# Altium PCB LTE GNSS Tracker.PcbDoc (part 3 of 5)
Units mil, origin at the board's own origin, x right, y up, seen from the top; angles counter-clockwise.
Board outline 2165.35 x 4361.93 mil, 4 copper layers (Top Layer, Layer 1, Layer 2, Bottom Layer), stack 38.189 mil thick; 158 components, 113 nets, 617 pads, 1197 vias.
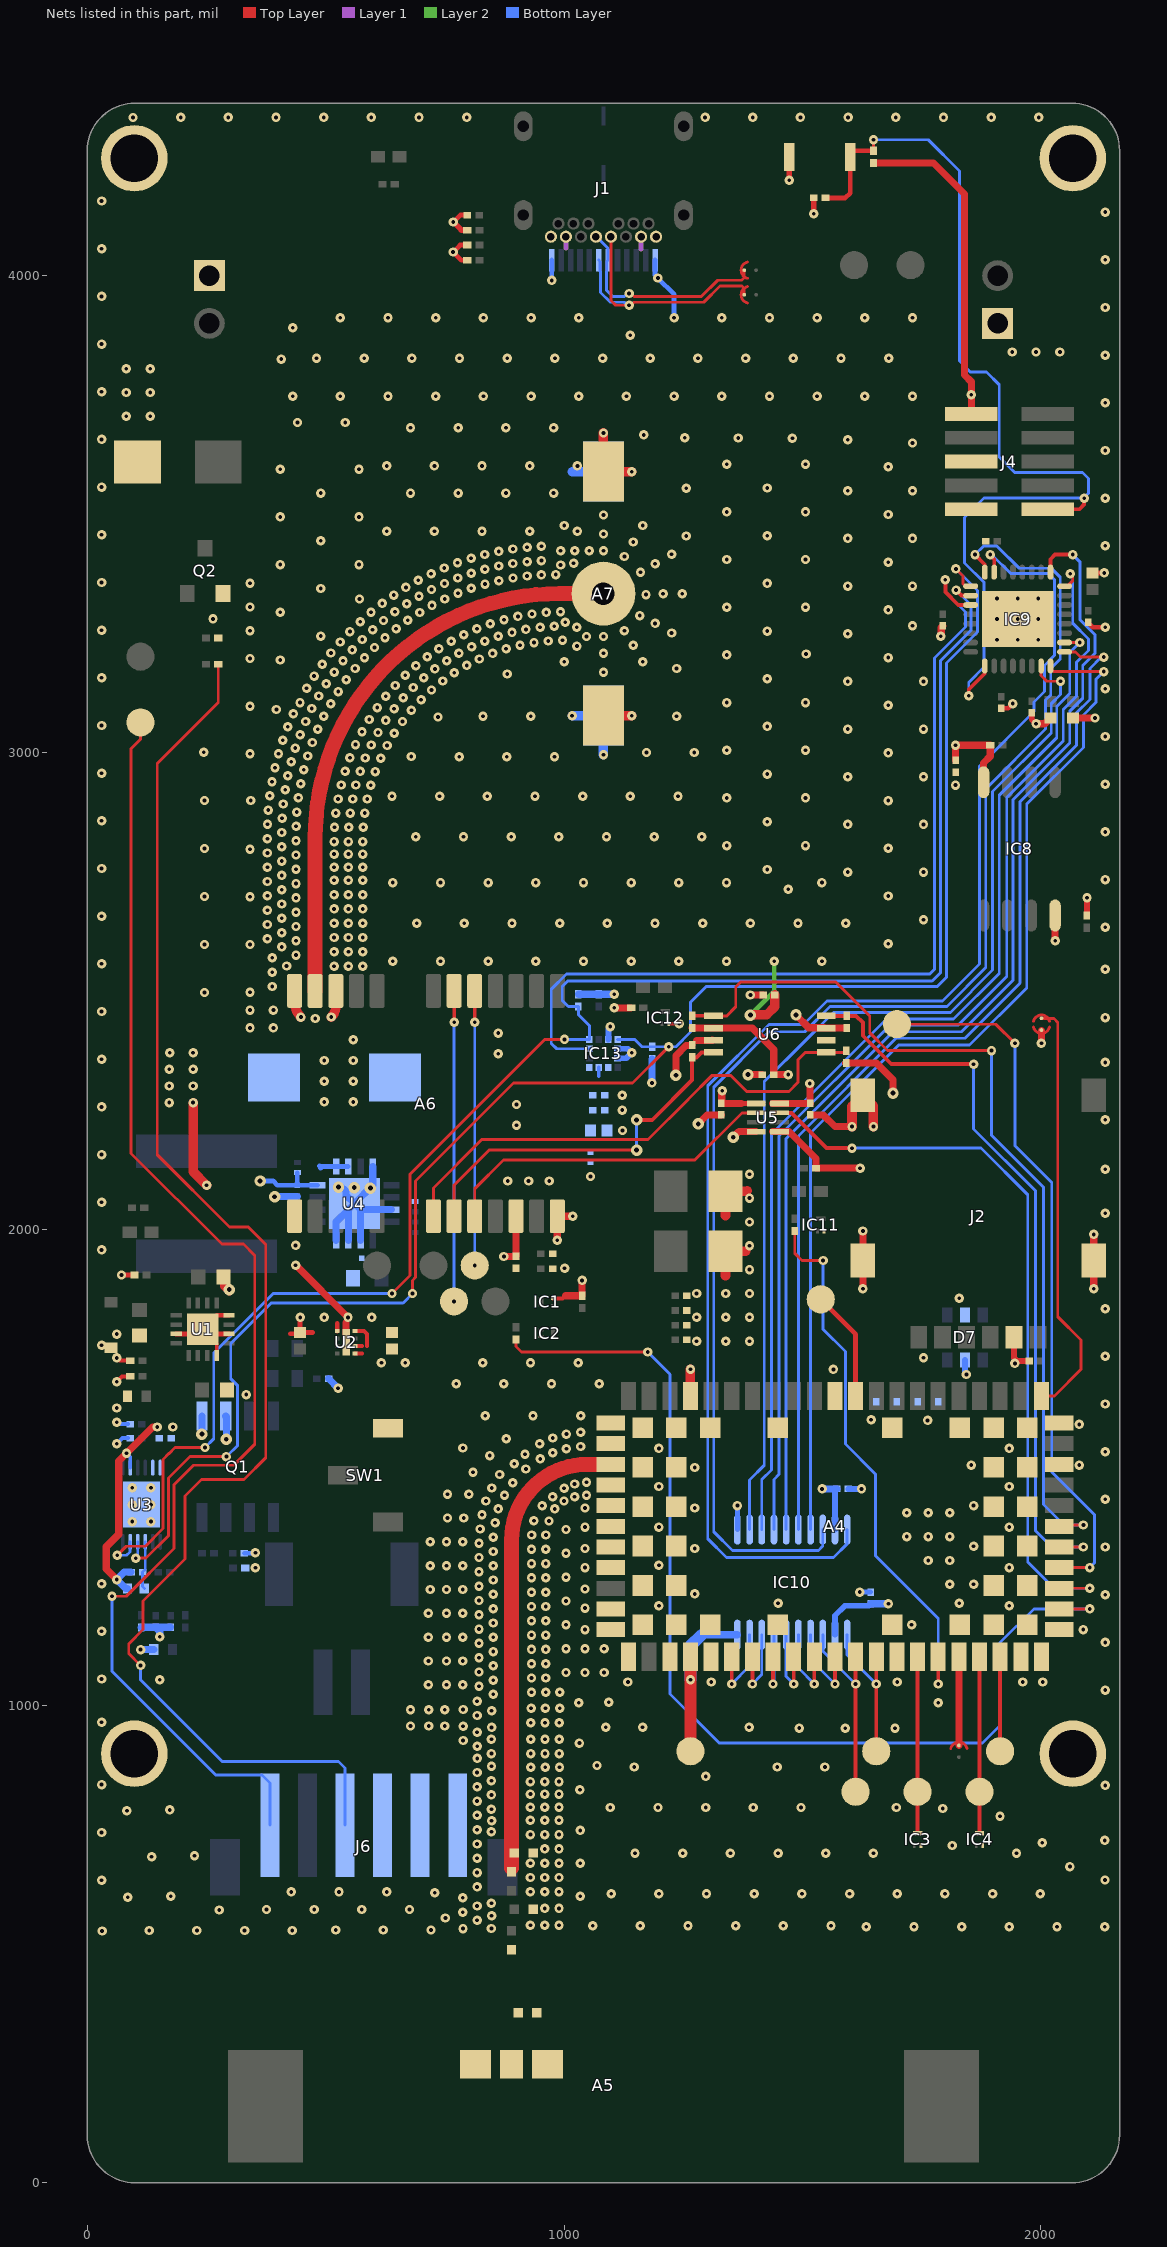
[diagram p4: the nets of this part, all layers, seen from the top]

## Part data (continued)
R8: library part Resistor, "RES SMD 330 OHM 1% 1/20W 0201", Device Package="0201 (0603 Metric)", Manufacturer=Yageo, Operating Temperature="-55°C ~ 125°C", Part Number=RC0201FR-07330RL, Power (Watts)="0.05W, 1/20W", Ratings=AEC-Q200, Supplier Device Package=0201, Supplier Part Number 1=YAG2604TR-ND, Temperature Coefficient=±200ppm/°C, Tolerance=±1%, ComponentLink1Description=Datasheet, ComponentLink1URL=https://industrial.panasonic.com/cdbs/www-data/pdf/RDA0000/AOA0000C304.pdf, ComponentLink2Description="DigiKey Link", ComponentLink2URL=http://digikey.com/product-detail/en/panasonic-electronic-components/ERJ-1GNF1002C/P122414CT-ND/7389440, Composition="Thick Film", Features="Automotive AEC-Q200", Height - Seated (Max)="0.010\" (0.26mm)", LastUpdated="21/01/2020 00:04:13", Lifecycle Status=Active, Minimum Order=1, Number of Terminations=2, Package / Case="0201 (0603 Metric)", Packaging=TapeAndReel, Part Status=Active, PartId=2296, Price=0.01, Resistance="330 Ohms", Series=ERJ, Size / Dimension="0.024\" L x 0.012\" W (0.60mm x 0.30mm)", Supplier 1=Digi-Key
R9 R14 R18: library part RSMT0626, "RES 100K OHM 1% 1/20W 0201", Manufacturer="Stackpole Electronics Inc", Part Number=RMCF0201FT100K, Supplier Part Number 1=RMCF0201FT100KTR-ND, ComponentLink1Description=Datasheet, ComponentLink1URL=https://chn-vm-apps.microchip.com/mchprepo/parts/Datasheets/AOA0000CE2.pdf, Supplier 1=Digi-Key
R10 R35: library part RSMT0626, "RES 1M OHM 1% 1/20W 0201", Manufacturer="Stackpole Electronics Inc", Part Number=RMCF0201FT1M00, Supplier Part Number 1=RMCF0201FT1M00TR-ND, ComponentLink1Description=Datasheet, ComponentLink1URL=https://chn-vm-apps.microchip.com/mchprepo/parts/Datasheets/AOA0000CE2.pdf, Supplier 1=Digi-Key
R11: library part ERJ-1GNJ205C, "Res Thick Film 0201 2M Ohm 5% 1/20W -400ppm/°C to 150ppm/°C Molded SMD SMD T/R", Case Code (Imperial)=0201, Case Code (Metric)=0603, Manufacturer=Panasonic, Max Operating Temperature=125°C, Max Power Dissipation=50mW, Min Operating Temperature=-55°C, Package Quantity=15000, Resistance=2MR, Resistor Type="Thick Film", Supplier Part Number 1=P123274CT-ND, Temperature Coefficient=150ppm/°C, Tolerance=5%, Voltage Rating=25V, Case/Package=0201, Category="Chip SMD Resistors", ComponentLink1Description=http://www.onlinecomponents.com/datasheet/erj-1gnj205c.aspx?p=44467765&src-supplier=Onlinecomponents.com, ComponentLink1URL=http://www.onlinecomponents.com/datasheet/erj-1gnj205c.aspx?p=44467765&src-supplier=Onlinecomponents.com, ComponentLink2Description=http://www.mouser.com/ds/2/315/AOA0000CE1-37422.pdf?src-supplier=Mouser, ComponentLink2URL=http://www.mouser.com/ds/2/315/AOA0000CE1-37422.pdf?src-supplier=Mouser, ComponentLink3Description=https://b2b-api.panasonic.eu/file_stream/pids/fileversion/1242?src-supplier=Digi-Key, ComponentLink3URL=https://b2b-api.panasonic.eu/file_stream/pids/fileversion/1242?src-supplier=Digi-Key, ComponentLink4Description=http://industrial.panasonic.com/www-cgi/jvcr13pz.cgi?E+PZ+3+AOA0002+ERJ1GNJ205C+7+WW?src-supplier=Digi-Key, ComponentLink4URL=http://industrial.panasonic.com/www-cgi/jvcr13pz.cgi?E+PZ+3+AOA0002+ERJ1GNJ205C+7+WW?src-supplier=Digi-Key, ComponentLink5Description=https://industrial.panasonic.com/cdbs/www-data/pdf/RDM0000/DMM0000COL11.pdf?src-supplier=Digi-Key, ComponentLink5URL=https://industrial.panasonic.com/cdbs/www-data/pdf/RDM0000/DMM0000COL11.pdf?src-supplier=Digi-Key, Height=0.01inch, Length=0.024inch, Manufacturer Part Number=ERJ-1GNJ205C, Mount="Surface Mount", Number of Terminations=2, Packaging="Tape and Reel", Power Rating=50mW, Pricing 1="1=0.10000, 10=0.03400, 100=0.01400, 1000=0.00629, 2500=0.00546, 5000=0.00451 (USD)", RoHS=Yes, RoHS Compliant=Yes, Stock 1=118626, Supplier 1=Digi-Key, Termination=SMD/SMT, Width=0.012inch
R12: library part ERJ-1GNJ394C, "Res Thick Film 0201 390K Ohm 5% 1/20W ±200ppm/°C Molded SMD SMD T/R", Case Code (Imperial)=0201, Case Code (Metric)=0603, Manufacturer=Panasonic, Max Operating Temperature=125°C, Max Power Dissipation=50mW, Min Operating Temperature=-55°C, Package Quantity=15000, Resistance=390kR, Resistor Type="Thick Film", Supplier Part Number 1=P123319CT-ND, Temperature Coefficient=200ppm/°C, Tolerance=5%, Voltage Rating=25V, Case/Package=0201, Category="Chip SMD Resistors", ComponentLink1Description=http://www.onlinecomponents.com/datasheet/erj-1gnj394c.aspx?p=44467790&src-supplier=Onlinecomponents.com, ComponentLink1URL=http://www.onlinecomponents.com/datasheet/erj-1gnj394c.aspx?p=44467790&src-supplier=Onlinecomponents.com, ComponentLink2Description=http://www.mouser.com/ds/2/315/AOA0000CE1-37422.pdf?src-supplier=Mouser, ComponentLink2URL=http://www.mouser.com/ds/2/315/AOA0000CE1-37422.pdf?src-supplier=Mouser, ComponentLink3Description=http://industrial.panasonic.com/www-cgi/jvcr13pz.cgi?E+PZ+3+AOA0002+ERJ1GNJ394C+7+WW?src-supplier=Digi-Key, ComponentLink3URL=http://industrial.panasonic.com/www-cgi/jvcr13pz.cgi?E+PZ+3+AOA0002+ERJ1GNJ394C+7+WW?src-supplier=Digi-Key, ComponentLink4Description=https://b2b-api.panasonic.eu/file_stream/pids/fileversion/1242?src-supplier=Digi-Key, ComponentLink4URL=https://b2b-api.panasonic.eu/file_stream/pids/fileversion/1242?src-supplier=Digi-Key, Height=0.01inch, Length=0.024inch, Manufacturer Part Number=ERJ-1GNJ394C, Mount="Surface Mount", Number of Terminations=2, Packaging="Tape and Reel", Power Rating=50mW, Pricing 1="1=0.10000, 10=0.03400, 100=0.01400, 1000=0.00629, 2500=0.00546, 5000=0.00451 (USD)", RoHS=Yes, Stock 1=14453, Supplier 1=Digi-Key, Width=0.3mm
R13 R22 R23 R24 R27 R28 R29: library part Resistor, "RES SMD 3.3K OHM 1% 1/20W 0201", Device Package="0201 (0603 Metric)", Manufacturer="Panasonic Electronic Components", Operating Temperature="-55°C ~ 125°C", Part Number=ERJ-1GNF3301C, Power (Watts)="0.05W, 1/20W", Ratings=AEC-Q200, Supplier Device Package=0201, Supplier Part Number 1=P122937CT-ND, Temperature Coefficient=±200ppm/°C, Tolerance=±1%, ComponentLink1Description=Datasheet, ComponentLink1URL=https://industrial.panasonic.com/cdbs/www-data/pdf/RDA0000/AOA0000C304.pdf, ComponentLink2Description="DigiKey Link", ComponentLink2URL=http://digikey.com/product-detail/en/panasonic-electronic-components/ERJ-1GNF3301C/P122937CT-ND/8342813, Composition="Thick Film", Features="Automotive AEC-Q200", Height - Seated (Max)="0.010\" (0.26mm)", LastUpdated="21/01/2020 00:04:10", Lifecycle Status=Active, Minimum Order=1, Number of Terminations=2, Package / Case="0201 (0603 Metric)", Packaging=TapeAndReel, Part Status=Active, PartId=4142, Price=0.01, Resistance="3.3 kOhms", Series=ERJ, Size / Dimension="0.024\" L x 0.012\" W (0.60mm x 0.30mm)", Supplier 1=DigiKey
R15: library part Thermistor, "THERMISTOR NTC 10KOHM 3380K 0402", B Value Tolerance=±1%, Device Package="0402 (1005 Metric)", Manufacturer="TDK Corporation", Operating Temperature="-40°C ~ 125°C", Power - Max=100mW, Resistance in Ohms @ 25°C=10k, Supplier Part Number 1=445-2550-1-ND, B25/50=3380K, B25/85=3435K, ComponentLink1Description=Datasheet, ComponentLink1URL=https://product.tdk.com/info/en/catalog/datasheets/503021/tpd_commercial_ntc-thermistor_ntcg_en.pdf?ref_disty=digikey, ComponentLink2Description="DigiKey Link", ComponentLink2URL=http://digikey.com/product-detail/en/tdk-corporation/NTCG103JF103FT1/445-2550-1-ND/934249, LastUpdated="21/01/2020 03:30:28", Lifecycle Status=Active, Minimum Order=1, Mounting Type="Surface Mount", Package / Case="0402 (1005 Metric)", Packaging=TapeAndReel, Part Number=NTCG103JF103FT1, Part Status=Active, PartId=199, Price=0.03, Resistance Tolerance=±1%, Series=NTCG, Supplier 1=DigiKey
R16: library part Resistor, "RES 0.01 OHM 1% 1/5W 0402", Device Package="0402 (1005 Metric)", Manufacturer="Panasonic Electronic Components", Operating Temperature="-55°C ~ 125°C", Part Number=ERJ-2LWFR010X, Power (Watts)="0.2W, 1/5W", Supplier Device Package=0402, Supplier Part Number 1=P19181CT-ND, Temperature Coefficient="0/ +500ppm/°C", Tolerance=±1%, ComponentLink1Description=Datasheet, ComponentLink1URL=https://industrial.panasonic.com/cdbs/www-data/pdf/RDN0000/AOA0000C313.pdf, ComponentLink2Description="DigiKey Link", ComponentLink2URL=http://digikey.com/product-detail/en/panasonic-electronic-components/ERJ-2LWFR010X/P19181CT-ND/6004536, Composition="Thick Film", Features="Current Sense", Height - Seated (Max)="0.018\" (0.45mm)", LastUpdated="21/01/2020 02:16:15", Lifecycle Status=Active, Minimum Order=1, Number of Terminations=2, Package / Case="0402 (1005 Metric)", Packaging=TapeAndReel, Part Status=Active, PartId=348, Price=0.05, Resistance="10 mOhms", Series=ERJ, Size / Dimension="0.039\" L x 0.020\" W (1.00mm x 0.50mm)", Supplier 1=DigiKey
R17: library part RSMT0626, "RES SMD 0 OHM JUMPER 1/16W 0402", Manufacturer=Yageo, Part Number=RC0402JR-070RP, Supplier Part Number 1=YAG1279TR-ND, ComponentLink1Description=Datasheet, ComponentLink1URL=https://chn-vm-apps.microchip.com/mchprepo/parts/Datasheets/AOA0000CE2.pdf, Supplier 1=Digi-Key
R19 R20 R21 R30: library part Resistor, "RES SMD 3.3K OHM 1% 1/20W 0201", Device Package="0201 (0603 Metric)", Manufacturer="Panasonic Electronic Components", Operating Temperature="-55°C ~ 125°C", Part Number=ERJ-1GNF3301C, Power (Watts)="0.05W, 1/20W", Ratings=AEC-Q200, Resistance="3.3 kOhms", Supplier Device Package=0201, Supplier Part Number 1=P122937CT-ND, Temperature Coefficient=±200ppm/°C, Tolerance=±1%, ComponentLink1Description=Datasheet, ComponentLink1URL=https://industrial.panasonic.com/cdbs/www-data/pdf/RDA0000/AOA0000C304.pdf, ComponentLink2Description="DigiKey Link", ComponentLink2URL=http://digikey.com/product-detail/en/panasonic-electronic-components/ERJ-1GNF3301C/P122937CT-ND/8342813, Composition="Thick Film", Features="Automotive AEC-Q200", Height - Seated (Max)="0.010\" (0.26mm)", LastUpdated="21/01/2020 00:04:10", Lifecycle Status=Active, Minimum Order=1, Number of Terminations=2, Package / Case="0201 (0603 Metric)", Packaging=TapeAndReel, Part Status=Active, PartId=4142, Price=0.01, Series=ERJ, Size / Dimension="0.024\" L x 0.012\" W (0.60mm x 0.30mm)", Supplier 1=DigiKey
R25 R26: library part Resistor, "RES SMD 1K OHM 1% 1/20W 0201", Device Package="0201 (0603 Metric)", Manufacturer="Panasonic Electronic Components", Operating Temperature="-55°C ~ 125°C", Part Number=ERJ-1GNF1001C, Power (Watts)="0.05W, 1/20W", Ratings=AEC-Q200, Supplier Device Package=0201, Supplier Part Number 1=P122413CT-ND, Temperature Coefficient=±200ppm/°C, Tolerance=±1%, ComponentLink1Description=Datasheet, ComponentLink1URL=https://industrial.panasonic.com/cdbs/www-data/pdf/RDA0000/AOA0000C304.pdf, ComponentLink2Description="DigiKey Link", ComponentLink2URL=http://digikey.com/product-detail/en/panasonic-electronic-components/ERJ-1GNF1001C/P122413CT-ND/7389439, Composition="Thick Film", Features="Automotive AEC-Q200", Height - Seated (Max)="0.010\" (0.26mm)", LastUpdated="21/01/2020 00:04:13", Lifecycle Status=Active, Minimum Order=1, Number of Terminations=2, Package / Case="0201 (0603 Metric)", Packaging=TapeAndReel, Part Status=Active, PartId=2298, Price=0.01, Resistance="1 kOhms", Series=ERJ, Size / Dimension="0.024\" L x 0.012\" W (0.60mm x 0.30mm)", Supplier 1=DigiKey
R31 R34: library part RSMT0626, "RES SMD 10K OHM 1% 1/20W 0201", Manufacturer=Yageo, Part Number=RC0201FR-0710KL, Supplier Part Number 1=311-10.0KMTR-ND, ComponentLink1Description=Datasheet, ComponentLink1URL=https://chn-vm-apps.microchip.com/mchprepo/parts/Datasheets/AOA0000CE2.pdf, Supplier 1=Digi-Key
R32 R33: library part Resistor, "RES 100 OHM 1% 1/20W 0201", Device Package="0201 (0603 Metric)", Manufacturer="KOA Speer Electronics, Inc.", Operating Temperature="-55°C ~ 155°C", Part Number=RK73H1HTTC1000F, Power (Watts)="0.05W, 1/20W", Ratings=AEC-Q200, Supplier Device Package=0201, Supplier Part Number 1=2019-RK73H1HTTC1000FCT-ND, Temperature Coefficient=±200ppm/°C, Tolerance=±1%, ComponentLink1Description=Datasheet, ComponentLink1URL=http://www.koaspeer.com/catimages/Products/RK73H/RK73H.pdf, ComponentLink2Description="DigiKey Link", ComponentLink2URL=http://digikey.com/product-detail/en/koa-speer-electronics-inc/RK73H1HTTC1000F/2019-RK73H1HTTC1000FCT-ND/9845801, Composition="Thick Film", Features="Automotive AEC-Q200, Moisture Resistant", Height - Seated (Max)="0.010\" (0.26mm)", LastUpdated="21/01/2020 00:04:16", Lifecycle Status=Active, Minimum Order=1, Number of Terminations=2, Package / Case="0201 (0603 Metric)", Packaging=TapeAndReel, Part Status=Active, PartId=1552, Price=0.01, Resistance="100 Ohms", Series=RK73H, Size / Dimension="0.024\" L x 0.012\" W (0.60mm x 0.30mm)", Supplier 1=DigiKey
Rth: library part RSMT0626, "THERMISTOR NTC 10KOHM 3380K 0402", Manufacturer="TDK Corporation", Part Number=NTCG103JF103HT1, Supplier Part Number 1=445-174898-2-ND, ComponentLink1Description=Datasheet, ComponentLink1URL=https://chn-vm-apps.microchip.com/mchprepo/parts/Datasheets/AOA0000CE2.pdf, Supplier 1=Digi-Key
S1: library part "SPST-NO 2 PIN", "SWITCH TACTILE SPST-NO 0.02A 15V", Contact Rating @ Voltage="0.02A @ 15VDC", Manufacturer=C&K, Operating Force=100gf, Operating Temperature="-40°C ~ 85°C", Supplier Part Number 1=CKN10777CT-ND, Actuator Height off PCB, Vertical=0.60mm, Actuator Orientation="Top Actuated", Actuator Type=Standard, Circuit=SPST-NO, ComponentLink1Description=Datasheet, ComponentLink1URL=https://dznh3ojzb2azq.cloudfront.net/products/Tactile/KXT3/documents/datasheet.pdf, ComponentLink2Description="DigiKey Link", ComponentLink2URL=http://digikey.com/product-detail/en/c-k/KXT-311-LHS/CKN10777CT-ND/6599755, Illumination=Non-Illuminated, LastUpdated="25/01/2020 19:35:40", Lifecycle Status=Active, Minimum Order=1, Mounting Type="Surface Mount", Outline="3.00mm x 2.00mm", Packaging=TapeAndReel, Part Number="KXT 311 LHS", Part Status=Active, Price=0.11, Series=KXT3, Supplier 1=DigiKey, Switch Function=Off-Mom, Termination Style="SMD (SMT) Tab"
SW1: library part SW_slide, "SWITCH SLIDE SPDT 300MA 6V", Manufacturer=C&K, Part Number=JS102011JCQN, Supplier Part Number 1=CKN10721TR-ND, Supplier 1=Digi-Key
U1: "Battery Charger Li-Ion 1500mA 4.1V 16-Pin VQFN EP T/R", Case/Package="VQFN EP", Manufacturer="Texas Instruments", Max Operating Temperature=85°C, Max Power Dissipation=2.3W, Max Supply Voltage=6.4V, Min Input Voltage=4.3V, Min Operating Temperature=-40°C, Min Supply Voltage=4.35V, Operating Supply Current=1.5mA, Output Current=1.5A, Output Voltage=4.1V, Package Quantity=250, Supplier Part Number 1=296-BQ24079TRGTTCT-ND, Category="Battery Management", ComponentLink1Description=https://datasheet.ciiva.com/15115/getdatasheetpartid-517600-15115033.pdf?src-supplier=Verical, ComponentLink1URL=https://datasheet.ciiva.com/15115/getdatasheetpartid-517600-15115033.pdf?src-supplier=Verical, ComponentLink2Description=https://datasheet.ciiva.com/1934/bq24075t-1934673.pdf?src-supplier=Digi-Key, ComponentLink2URL=https://datasheet.ciiva.com/1934/bq24075t-1934673.pdf?src-supplier=Digi-Key, Contact Plating=Gold, Lead Free="Lead Free", Manufacturer Part Number=BQ24079TRGTT, Number of Cells=1, Number of Pins=16, Packaging="Tape and Reel", Pricing 1="1=3.03000, 10=2.72500, 25=2.57040, 100=2.19010 (USD)", Radiation Hardening=No, RoHS=Yes, RoHS Compliant=Yes, Series=-, Stock 1=10, Supplier 1=Digi-Key
U2: "IC REG LINEAR 3.3V 1A 8XDFN", Manufacturer="ON Semiconductor", Supplier Part Number 1=NCP186BMX330TAGOSTR-ND, Part Number=NCP186BMX330TAG, RefDes=RefDes, Supplier 1=Digi-Key, Type=DEV, Vendor="ON Semiconductor"
U3: library part "TI BQ27542DRZR-G1", "IC BATT FUEL GAUGE LI-ION 12SON", Device Package="12-VFDFN Exposed Pad", Manufacturer="Texas Instruments", Operating Temperature="-40°C ~ 85°C (TA)", Supplier Device Package="12-SON (2.5x4)", Supplier Part Number 1=296-44346-1-ND, Battery Chemistry=Lithium-Ion, ComponentLink1Description=Datasheet, ComponentLink1URL=http://www.ti.com/general/docs/suppproductinfo.tsp?distId=10&gotoUrl=http%3A%2F%2Fwww.ti.com%2Flit%2Fgpn%2Fbq27542-g1, ComponentLink2Description="DigiKey Link", ComponentLink2URL=http://digikey.com/product-detail/en/texas-instruments/BQ27542DRZR-G1/296-44346-1-ND/6110619, Function="Battery Monitor", Interface="HDQ, I²C", LastUpdated="30/03/2020 16:23:27", Lifecycle Status=Active, Minimum Order=1, Mounting Type="Surface Mount", Number of Cells=1, Package / Case="12-VFDFN Exposed Pad", Packaging=TapeAndReel, Part Number=BQ27542DRZR-G1, Part Status=Active, Price=1.28, Series="Impedance Track™", Supplier 1=DigiKey
U4: "5-V Output, 1-A, 96% Efficient Boost Converter w/20uA Iq in TSSOP-16 16-QFN -40 to 85", Case/Package=VQFN, Manufacturer="Texas Instruments", Max Input Voltage=5.5V, Max Operating Temperature=85°C, Max Output Current=1A, Min Input Voltage=1.8V, Min Operating Temperature=-40°C, Min Output Voltage=5V, Package Quantity=1, Quiescent Current=20uA, Supplier Part Number 1=296-16662-6-ND, Switching Frequency=600kHz, Category="Voltage Regulators - Switching", ComponentLink1Description=https://datasheet.ciiva.com/15113/getdatasheetpartid-188315-15113727.pdf?src-supplier=Verical, ComponentLink1URL=https://datasheet.ciiva.com/15113/getdatasheetpartid-188315-15113727.pdf?src-supplier=Verical, ComponentLink2Description=https://datasheet.ciiva.com/26896/tps61032rsar-26896598.pdf?src-supplier=IIIC, ComponentLink2URL=https://datasheet.ciiva.com/26896/tps61032rsar-26896598.pdf?src-supplier=IIIC, ComponentLink3Description=https://datasheet.ciiva.com/22684/1902788-22684647.pdf?src-supplier=Element14, ComponentLink3URL=https://datasheet.ciiva.com/22684/1902788-22684647.pdf?src-supplier=Element14, ComponentLink4Description=https://datasheet.ciiva.com/2026/tps61030-2026190.pdf?src-supplier=Digi-Key, ComponentLink4URL=https://datasheet.ciiva.com/2026/tps61030-2026190.pdf?src-supplier=Digi-Key, ComponentLink5Description=https://datasheet.ciiva.com/2026/tps61030-2026189.pdf?src-supplier=Digi-Key, ComponentLink5URL=https://datasheet.ciiva.com/2026/tps61030-2026189.pdf?src-supplier=Digi-Key, ComponentLink6Description=https://datasheet.ciiva.com/2026/tps61030-2026191.pdf?src-supplier=Digi-Key, ComponentLink6URL=https://datasheet.ciiva.com/2026/tps61030-2026191.pdf?src-supplier=Digi-Key, Efficiency=96%, Lead Free="Lead Free", Manufacturer Part Number=TPS61032RSAR, Mount="Surface Mount", Nominal Output Voltage=5V, Number of Outputs=1, Number of Pins=16, Operating Supply Voltage=5.5V, Output Configuration=Positive, Output Current=1A, Output Type=Fixed, Output Voltage=5V, Packaging="Tape and Reel", Pricing 1="1=3.13000, 10=2.80800, 25=2.65440, 100=2.30060, 250=2.18260, 500=1.95844, 1000=1.94775 (USD)", Radiation Hardening=No, REACH SVHC="No SVHC", RoHS=Yes, RoHS Compliant=Yes, Series=-, Stock 1=5439, Supplier 1=Digi-Key, Synchronous Rectifier=Yes, Topology=Boost, Weight=0.001464oz, Width=4mm
U5: "IC TXRX BUS 2BIT DUAL 3ST 8XSON", Manufacturer=Nexperia, Supplier Part Number 1=1727-6903-2-ND, Category="Voltage Level Shifters", ComponentLink1Description=https://assets.nexperia.com/documents/data-sheet/74AVCH2T45.pdf?src-supplier=Digi-Key, ComponentLink1URL=https://assets.nexperia.com/documents/data-sheet/74AVCH2T45.pdf?src-supplier=Digi-Key, Manufacturer Part Number=74AVCH2T45GT,115, Pricing 1="5000=0.19239 (USD)", RoHS=Yes, RoHS Compliant=Yes, Stock 1=342616, Supplier 1=Digi-Key
U6: "Voltage Level Translator 2-CH Bidirectional Automotive 8-Pin TSSOP T/R", Case/Package=TSSOP, High Level Output Current=-20uA, Low Level Output Current=20uA, Manufacturer="NXP Semiconductors", Max Operating Temperature=125°C, Max Power Dissipation=250mW, Max Supply Voltage=3.6V, Min Operating Temperature=-40°C, Min Supply Voltage=1.2V, Nominal Supply Current=3.3uA, Package Quantity=3000, Supplier Part Number 1=568-12374-6-ND, Category="Logic Gates", Channel Type=Bidirectional, ComponentLink1Description=https://datasheet.ciiva.com/29887/ntb0102-q100-29887588.pdf?src-supplier=Avnet, ComponentLink1URL=https://datasheet.ciiva.com/29887/ntb0102-q100-29887588.pdf?src-supplier=Avnet, ComponentLink2Description=https://datasheet.ciiva.com/29615/ntb0102-q100-29615979.pdf?src-supplier=Digi-Key, ComponentLink2URL=https://datasheet.ciiva.com/29615/ntb0102-q100-29615979.pdf?src-supplier=Digi-Key, Data Rate=100Mbps, Logic Function=Translator, Manufacturer Part Number=NTB0102DP-Q100H, Mount="Surface Mount", Number of Bits=2, Number of Channels=2, Number of Circuits=1, Number of Pins=8, Output Type=Voltage, Packaging="Tape and Reel", Pricing 1="1=1.30000, 10=1.16200, 25=1.10240, 100=1.06880 (USD)", Propagation Delay=4.4ns, Radiation Hardening=No, RoHS=Yes, RoHS Compliant=Yes, Stock 1=8500, Supplier 1=Digi-Key, Turn-On Delay Time=5.9ns
SB1 SB2 SB3 SB4: Artikkelnr Noca=N.A., Artikkelnr Simpro=N.A., Footprint Doc=Solderbridge, LatestRevisionDate=2009-12-14, Part Number=Solderbridge, Pin Count=2, Published=2009-12-14, Publisher="Nordic Semiconductor"

## Via types
v1: diameter 19.68, hole 7.87, Top Layer to Bottom Layer, 1112 vias
v2: diameter 19.68, hole 7.87, Top Layer to Bottom Layer, tented both sides, 56 vias
v3: diameter 24, hole 10, Top Layer to Bottom Layer, 29 vias

## Nets (pads, with @x,y where several pads share a name; then routed paths per layer and width w, separated by ;. In a path a pad name is that pad's centre, name@x,y a point inside that pad or via, vN(x,y) a via of type N, cw(c..) or ccw(c..) an arc to the next point about the centre after c; other vN are vias at no path point)
1V8: A4.4 C25.2 C28.2 C52.2 IC10.2 IC10.10 R19.1 R20.1 TP17.1 U5.8 U6.3 U6.6 | length 1049.2
  Top Layer w15: R20.1@1268.54,2422.44 1268.81,2422.17 1310.44,2422.17 1310.72,2421.9 1394.92,2421.9 1439.74,2377.07 C28.2@1439.74,2324.3 v2(1470,2324.3) ; U5.8@1437.38,2263.8 1516.43,2263.8 C25.2@1516.59,2263.96 1515.56,2264.99 v2(1515.56,2305.55) ; v3(1486.48,2449.35) 1513.33,2422.51 1546.33,2422.51 1546.94,2421.9 R19.1@1591.88,2421.89
  Top Layer w25: TP17.1@1265.11,904.93 v1(1265.11,1055.19) A4.4@1265.11,1103.13
  Bottom Layer w12: IC10.2@1568.26,1149.38 1568.26,1189.45 1589,1210.19 1639.07,1210.19 C52.2@1643.34,1214.41
  Bottom Layer w15: 1288.75,1149.39 IC10.10@1363.54,1149.38 ; C52.2@1643.34,1214.41 v2@1679,1214.43
  Bottom Layer w25: v1(1265.11,1055.19) 1265.11,1125.74 1288.75,1149.39
  other v2: 1680.29,1214.41
3V3: A6.22 C13.2 C24.2 C26.2 C27.2 C37.2 C53.2 FB1.1 FB5.1 IC1.S IC8.8 IC10.19 J4.1 R18.2 R21.1 R22.2 R23.2 R24.2 R25.1 R26.1 R27.2 R28.2 R29.2 R30.1 U2.1 U2.2 U2.4 U5.1 U5.5 U6.7 | length 2150
  Top Layer w8: U2.1@561.68,1739.17 576.02,1739.17 ; U2.2@561.68,1754.92 576.77,1754.92 ; U2.4@561.68,1786.42 580.43,1786.42 586.85,1780 586.85,1755 ; IC1.S@977.12,1854.37 996.99,1854.37 1002.9,1860.28
  Top Layer w10: 1371.72,2263.8 U5.1@1417.69,2263.8
  Top Layer w12: R23.2@2096.8,2657.84 2096.85,2657.89 2096.85,2693.91 v1(2096.85,2695)
  Top Layer w15: v2(873.78,1942.76) C24.2@899.24,1942.76 A6.22@899.24,2027.29 ; 1002.9,1860.28 R18.2@1037.77,1860.28 v2(1037.77,1892.5) ; v1(1105.06,2464.3) R26.1@1140.77,2464.3 ; v3(1234.58,2322.88) 1234.58,2363.79 1255.82,2385.04 1267.93,2385.04 1268.54,2385.65 R21.1@1268.54,2386.2 ; 1277.48,2395.69 1310.11,2395.69 U6.7@1310.72,2396.3 ; v2(1331.71,2290.48) 1330.81,2289.58 1330.81,2264.64 1330.74,2264.57 1330.74,2264.34 1330.37,2263.96 C26.2@1330.13,2263.96 1330.3,2263.8 1371.72,2263.8 ; v2(1390.81,2491.2) C27.2@1417.81,2491.2 ; U5.5@1437.38,2204.74 1471.92,2204.74 1528.56,2148.1 R25.1@1528.56,2128.04 v2(1620.94,2128.04) ; R30.1@1590.82,2348.6 R30.1@1591.82,2348.6 1654.83,2348.6 1689.94,2313.48 v3(1689.94,2285.57) ; R24.2@1649.01,4236.45 1775.01,4236.45 1840.23,4171.22 1840.23,3791.58 1854.3,3777.52 v2(1854.3,3750) J4.1@1854.3,3710 ; C37.2@1821.16,2983.26 v1(1821.16,3014.9) R22.2@1893.4,3014.9 ; IC8.8@1880.1,2937.47 1880.1,2978.1 1893.96,2991.96 R22.2@1893.96,3014.9 ; FB1.1@2067.85,3072.11 v1(2113.66,3072.11)
  Bottom Layer w12: IC10.19@1568.26,1369.86 1568.26,1451.6 C53.2@1571.84,1455.18
  Bottom Layer w15: R28.2@1030.15,2492.8 R27.2@1072.9,2492.8 v2(1105.07,2492.8) ; v2(1184.24,2306.86) 1184.4,2307.02 1184.4,2357.05 R29.2@1184.55,2357.2 ; v2(1541.25,1455.18) C53.2@1571.84,1455.18
  other v1: 616.85,1720 666.85,1720 1055.51,2110.39
3V3_ACCEL: C56.2 C57.2 C58.2 FB5.2 IC13.9 IC13.10 | length 18
  Bottom Layer w8: 1072.83,2320.98 IC13.9@1072.83,2338.98
+5V0: C8.1 C9.2 D3.C J5.1 J6.6 J7.1 R35.1 U4.1 U4.15 U4.16 | length 401.3
  Top Layer w20: v1(221.85,2265.51) 221.85,2120.7 v1(250.28,2092.26)
  Bottom Layer w10: v3(362.41,2101.12) 389.88,2101.12 398.87,2092.12 C9.2@440.49,2092.12 ; R35.1@440.49,2118.56 C9.2@440.49,2092.12 ; 447.85,2092.19 482.55,2092.19 U4.1@482.62,2092.26 ; 447.85,2092.26 440.62,2092.26 C9.2@440.49,2092.12 ; 487.13,2132.57 489.35,2130.35 489.35,2127.59 493.38,2131.63 U4.16@521.99,2131.63 U4.15@547.58,2131.63
  other v1: 151.85,1055 171.85,2265.51 171.85,2300.38 221.85,2300.38 171.85,2335.25 221.85,2335.25 172.72,2370.12 221.85,2370.12 81.85,3705 131.85,3705 81.85,3755 131.85,3755 81.85,3805 131.85,3805 1940,3840 1990,3840 2040,3840
ACCEL_INT: IC9.3 IC13.12 | length 1970.6
  Top Layer w8: v1(1799.79,3362.07) 1799.79,3336.26 1826.79,3309.26 IC9.3@1852.97,3309.26
  Bottom Layer w6: IC13.12@1053.15,2378.35 984.65,2378.35 973.2,2389.8 973.2,2503.21 1005.3,2535.31 1767.15,2535.31 1777.06,2545.22 1777.06,3198.22 1841.85,3263 1841.85,3294.21 1799.79,3336.26 v1(1799.79,3362.07)
BCVCC: C20.1 C23.2 R15.1 U3.2 U3.5 | length 479.1
  Top Layer w15: v1(61.85,1265) 39.85,1287 39.85,1334 66,1360.15 66,1513.87 137.13,1585 v1(146.85,1585)
  Bottom Layer w8: v1(82.13,1530) 90.13,1522 U3.2@90.13,1499.81
  Bottom Layer w15: R15.1@84.39,1246.39 80.46,1246.39 v1(61.85,1265) 77.56,1280.71 C20.1@91.6,1280.71
BM_TS: C20.2 R15.2 U3.9 | length 101.8
  Bottom Layer w6: R15.2@119.83,1246.39 116.01,1250.21 C20.2@116.09,1280.74 121.62,1286.32 U3.9@121.63,1344.3
CONTROL: J6.1 TP1.1 | length 2840
  Top Layer w6: v1(51.85,1230) 81.86,1230 182,1330.14 182,1463.88 222.87,1504.74 307.06,1504.74 351.11,1548.8 351.11,1945.09 327.58,1968.63 282.31,1968.63 91.85,2159.09 91.85,3007.85 111.53,3027.53 TP1.1@111.53,3063.04
  Bottom Layer w6: v1(51.85,1230) 51.85,1072.91 269.48,855.27 366.46,855.27 383.15,838.58 J6.1@383.15,750
D_N: J1.A7 J1.B7 SB3.1 | length 456.9
  Top Layer w6: v2(1136.47,3962.5) 1140.17,3962.5 1146.51,3956.16 1287.92,3956.16 1322.23,3990.47 1372.39,3990.47 1377.19,3995.27 SB3.1@1377.19,4011.48
  Bottom Layer w6: J1.B7@1066.93,4081.81 1068.21,4081.81 1092.52,4057.5 J1.A7@1092.52,4032.6 1089.61,4029.69 1089.61,4009.4 1088.68,4008.46 1088.68,3969.64 1102.16,3956.16 1126.42,3956.16 1132.76,3962.5 v2(1136.47,3962.5)
D_P: J1.A6 J1.B6 SB2.1 | length 590.3
  Top Layer w6: J1.B6@1098.43,4081.81 1098.43,3986.82 1098.43,3966.48 1098.43,3947.68 1108.29,3937.82 v2(1136.47,3937.82) 1140.17,3937.82 1146.51,3944.16 1292.89,3944.16 1327.2,3978.47 1373.13,3978.47 1377.19,3974.4 1377.19,3973.08 SB2.1@1377.19,3960
  Bottom Layer w6: J1.A6@1072.83,4032.6 1075.74,4029.69 1075.74,4009.4 1076.68,4008.46 1076.68,3964.67 1097.19,3944.16 1126.42,3944.16 1132.76,3937.82 v2(1136.47,3937.82)
DATA_RDY: A4.24 U5.7 | length 1593
  Top Layer w6: U5.7@1437.38,2244.11 U5.7@1438.03,2243.45 ; A4.24@2038.74,1246.83 2038.79,1246.89 v2(2102.43,1246.89)
  Top Layer w8: U5.7@1438.03,2243.45 1476.9,2243.45 1550.35,2170 v2(1603.92,2170)
  Bottom Layer w6: v2(1603.92,2170) 1874.78,2170 1972.53,2072.25 1972.53,1302.11 2027.76,1246.89 v2(2102.43,1246.89)
GND: A4.1 A4.3 A4.5 A4.14 A4.20 A4.21 A4.22 A4.30 A4.32 A4.43 A4.50 A4.54 A4.55 A4.57 A4.58 A4.59 A4.60 A4.61 A4.63 A4.64 A4.65 A4.66 A4.67 A4.68 A4.69 A4.70 A4.71 A4.72 A4.73 A4.74 A4.75 A4.76 A4.77 A4.78 A4.79 A4.80 A4.81 A4.82 A4.83 A4.84 A4.85 A4.86 A4.87 A4.88 A4.89 A4.90 A4.91 A4.92 A4.93 A4.94 A4.95 A4.96 A5.G A6.10 A6.12 A6.13 A6.24 A7.G C1.1 C2.1 C3.1 C4.1 C5.1 C6.1 C7.1 C8.2 C9.1 C10.1 C11.1 C12.1 C13.1 C16.1 C17.1 C18.1 C19.1 C22.2 C23.1 C24.1 C25.1 C26.1 C27.1 C28.1 C31.1 C32.1 C33.1 C34.1 C35.1 C36.1 C37.1 C38.2 C39.1 C40.1 C41.1 C42.2 C43.2 C44.1 C45.1 C46.1 C47.1 C48.1 C50.1 C51.1 C52.1 C53.1 C54.1 C55.1 C56.1 C57.1 C58.1 D5.2 D7.2 D7.5 IC2.S IC3.S IC4.S IC8.4 IC9.0 IC10.11 IC11.S IC12.S IC13.3 IC13.5 IC13.6 IC13.8 J1.A1 J1.A12 J1.B1 J1.B12 J1.G1 J1.G2 J2.C5 J2.S J4.5 J4.9 J6.4 J6.5 L3.1 MNT1.1 MNT2.1 MNT3.1 MNT4.1 Q1.1 Q1.2 Q2.2 R1.2 R3.1 R4.2 R6.2 R7.2 R8.2 R10.1 R12.2 R14.1 R16.1 R33.2 Rth.2 S1.2 SB4.2 SW1.3 U1.4 U1.6 U1.8 U1.15 U1.17 U2.5 U2.9 U3.6 U3.13 U4.5 U4.6 U4.7 U4.10 U4.13 U4.17 U5.4 U6.2 | length 4186
  Top Layer w8: v1(61.85,1680) 73,1691.15 R7.2@90.21,1691.24 ; v1(61.85,1730) 67.4,1724.45 R1.2@90.21,1724.45 ; U1.17@264.8,1767.21 271.49,1760.52 U1.4@271.49,1733.55 ; IC12.S@1219.49,2430.95 v1(1241.85,2430.87)
  Top Layer w10: v1(71.85,1903.95) R3.1@98.9,1903.95 ; U1.15@185.47,1780.2 232.11,1780.2 241.96,1790.05 251.81,1780.2 U1.6@298.46,1780.2 ; U1.17@264.8,1812.88 271.49,1819.57 U1.8@298.46,1819.57 ; 425.69,1780.71 443.32,1780.71 C12.1@446.1,1783.49 ; v1(446.85,1815) 446.1,1814.25 C12.1@446.1,1783.49 ; 472.36,1783.49 C12.1@446.1,1783.49 ; U2.5@524.28,1786.42 524.28,1802.57 ; v1(767.82,4112.46) 782.45,4127.09 C5.1@797.4,4127.09 ; R4.2@796.81,4032.6 784.3,4032.55 v1(767.23,4049.62) 781.86,4064.25 R6.2@796.81,4064.33 ; C36.1@1916.86,3092.85 1931.7,3092.85 v1(1941.35,3102.5) ; C34.1@2099.85,3272.72 2099.85,3271.74 2101.74,3269.85 2101.92,3269.85 2109.41,3262.36 v1(2135.35,3262.36) ; C38.2@2108.1,3376.55 v1(2132.85,3376.55)
  Top Layer w12: v1(767.82,4112.46) 784.73,4095.55 R8.2@796.81,4095.59 ; v1(1472.21,4200.36) S1.2@1472.21,4249.24 ; v1(1523.9,4130) C39.1@1523.9,4163.09 ; J2.C5@1943.91,1772.88 1943.91,1730.28 1945.71,1728.48 v1(1945.71,1718.48) 1950.71,1723.48 C44.1@1975.35,1723.48 ; C35.1@1980.96,3082.85 1980.96,3069.19 v1(1990.15,3060)
  Top Layer w15: C2.1@285.81,1900.17 286.06,1899.92 286.06,1880 v3@297.64,1868.42 ; v1(436.94,1924.58) 437.1,1924.58 546.68,1815 v1(546.85,1815) ; U2.9@542.98,1762.8 542.98,1803.87 ; v1(985.85,1976.95) A6.24@985.85,2027.29 v1(1018.31,2027.29) ; v3(1281.33,2220.88) 1300.01,2239.55 C26.1@1330.13,2239.55 ; v3(1354.98,2193.04) 1366.62,2204.67 U5.4@1402.94,2204.67 ; v3(1385.81,2324.22) 1385.89,2324.3 C28.1@1415.33,2324.3 ; C25.1@1516.59,2239.55 1543.85,2239.55 1568.22,2215.19 v1(1604,2215.19) ; v1(1626.78,1875.19) J2.S@1626.79,1934.29 v1(1626.79,1996.3) ; v2(1790.17,3243.56) 1791.06,3244.46 1791.06,3261.77 1794.02,3264.74 1794.02,3264.97 1794.4,3265.35 C32.1@1794.63,3265.35 ; v1(1990.15,3060) 2008.09,3060 C31.1@2020.2,3072.11 ; v2(2001.25,2389.83) 2001.33,2389.91 SB4.2@2001.33,2416.7 ; v1(2030.09,2605) IC8.4@2030.1,2657.94 ; v1(2111.03,1875.19) J2.S@2111.04,1934.29 v1(2111.04,1989.01)
  Top Layer w20: A6.12@434.67,2511.88 434.67,2477.18 ccw(c480.32,2477.18) v1(448.04,2444.9) ; v1(511.85,2445) ccw(c489.06,2467.79) 521.29,2467.79 A6.10@521.29,2519.59 ; A7.G@1082.68,3077.17 v1(1141.85,3077.17) ; v1(1082.68,3670) A7.G@1082.68,3588.98 v1(1141.85,3588.98) ; A4.50@1265.11,1650.37 v1(1265.11,1706.3) ; 1338.64,1902.72 1338.64,1953.64 1381.1,1953.64 ; 1338.64,2028.72 C42.2@1338.65,2079.64 1383.45,2079.64 1384,2080.19 ; v3(1390.81,2449.07) 1391.57,2449.84 1425.08,2449.84 1442.22,2466.98 C27.1@1442.22,2491.2 ; v1(1604,2215.19) 1604,2257.98 J2.S@1626.79,2280.75 1649,2258.54 v1(1649,2215.19)
  Layer 1 w10: 1003.94,4057.91 J1.G2@1003.94,4081.81 ; 1161.42,4055.43 J1.G1@1161.42,4081.81
  Layer 2 w10: v3(1390.81,2449.07) 1440.81,2499.07 v1(1440.81,2561.93)
  Bottom Layer w8: v1(61.85,1550) 73.66,1561.81 C17.1@85.3,1561.81 ; v1(61.85,1595) 65.54,1591.31 C18.1@85.3,1591.31
  Bottom Layer w10: C6.1@329.55,1320.27 v1@352.56,1320.29 ; v1(974.41,3990) J1.A1@974.41,4032.6 ; J1.A12@1190.94,4032.6 1190.94,4000.91 v1(1196.85,3995) 1230.81,3961.04 v1(1230.81,3911.93) ; IC10.11@1363.54,1369.86 v1(1363.54,1420.19) ; v1(1620,1238.84) C52.1@1643.34,1238.82
  Bottom Layer w12: IC13.3@1092.52,2398.03 1093.41,2398.92 1093.41,2419.39 1096.85,2422.82 v1(1096.85,2424.9) ; IC13.6@1112.2,2358.66 1130.51,2358.66 v1(1141.85,2370) 1133.5,2378.35 IC13.5@1112.2,2378.35 ; C53.1@1596.25,1455.18 v1(1624,1455.18) ; D7.2@1840.87,1725.62 1840.87,1698.32 v1(1844,1695.19)
  Bottom Layer w15: v1(111.85,1118.26) R16.1@139.39,1118.35 ; R33.2@112.83,1164.39 113.44,1165.04 C22.2@143.17,1164.98 C22.2@143.25,1164.95 ; v1(151.85,1145) 151.85,1156.35 C22.2@143.25,1164.95 ; C19.1@174.83,1164.98 C22.2@143.25,1164.95 ; v3(240.43,1570.28) Q1.1@240.43,1607.77 ; Q1.2@290.43,1607.77 291.69,1606.51 v3(291.69,1559.51) ; v3(392.73,2068.22) 393,2068.5 C9.1@440.49,2068.5 ; C7.1@505.94,1686.63 v1(526.11,1666.46) ; U4.5@521.99,1976.12 521.99,2015.49 U4.17@547.58,2041.08 ; U4.17@538.61,2084.21 542.94,2079.88 542.94,2071.31 U4.17@560.37,2053.88 ; U4.6@547.58,1976.12 U4.17@547.58,2041.08 ; U4.7@573.17,1976.12 U4.17@573.17,2041.08 ; U4.13@598.76,2131.63 598.76,2092.26 U4.17@560.37,2053.88 ; U4.10@638.13,2041.08 U4.17@573.17,2041.08 ; U4.17@547.58,2041.08 U4.17@560.37,2053.88 ; U4.17@560.37,2053.88 U4.17@573.17,2041.08
  Bottom Layer w20: v1(1016.85,3077.17) A7.G@1082.68,3077.17 v1(1082.68,2995) ; 1016.85,3588.98 A7.G@1082.68,3588.98
  other v1: 31,527.93 129.89,528.93 229.89,528.93 329.89,528.93 429.89,528.93 520.89,529.93 620.89,529.93 720.89,529.93 788.07,533.04 847.65,533.18 1634,537 1734,537 1834,537 1934,537 2034,537 2134,537 1060,539 1160,539 1260,539 1360,539 1460,539 1560,539 929.4,540 959.4,540 989.4,540 817.65,550.31 751.19,555.34 848,560 787.65,567.43 277,571.93 375.89,572.93 475.89,572.93 575.89,572.93 675.89,572.93 959.4,575.31 989.4,575.31 817.65,580.31 847.65,586 787.65,597.43 84.89,598.93 174.92,600.93 1034,600.84 1098.89,605.93 1198.89,605.93 1298.89,605.93 1398.89,605.93 1498.89,605.93 1598.89,605.93 1698.89,605.93 1798.89,605.93 1898.89,605.93 1998.89,605.93 729,608 427.89,609.93 527.89,609.93 627.89,609.93 929.4,610.17 959.4,610.17 989.4,610.17 817.65,620.48 30,634.51 2134.54,635 929.4,640.17 959.4,640.17 989.4,640.17 817.65,650.48 2061,663 929.4,670.17 959.4,670.17 989.4,670.17 1034,670.17 817.65,680.48 134.89,683.93 224.92,685.93 1148.89,690.93 1248.89,690.93 1348.89,690.93 1448.89,690.93 1548.89,690.93 1648.89,690.93 1948.89,690.93 959.4,700.17 989.4,700.17 1814.31,707.2 817.65,710.48 2003,712.96 2134,718 929.4,730.17 959.4,730.17 989.4,730.17 30,734.51 847.65,736 1034,739 817.65,740.48 848.07,759 929.4,760.17 959.4,760.17 989.4,760.17 1914.41,768.55 817.65,770.48 83.09,779.93 173.12,781.93 847.65,783.35 1794.11,785 1097.09,786.93 1197.09,786.93 1297.09,786.93 1397.09,786.93 1497.09,786.93 1697.09,786.93 929.4,787.67 959.4,787.67 989.4,787.67 817.65,800.48 847.65,813.35 929.4,815.17 959.4,815.17 989.4,815.17 1033.26,823.98 817.65,830.48 2135.35,833.32 30,835 929.4,841.4 959.4,841.4 989.4,841.4 847.65,843.35 1297.09,852.25 817.65,860.48 930.33,871.39 960.4,871.38 990.47,871.38 1147.09,871.93 1447.09,871.93 1547.09,871.93 847.83,873.35 1069,875 818.07,890 847.65,900 930,900 960,900 990,900 818.07,915.34 1032.16,922.12 788.26,927.43 847.65,930 930,930 960,930 990,930 817.65,945 1590,953.1 1694.11,953.1 1493.32,953.54 848.07,955 1388.11,955.1 1087.32,955.54 1164.72,955.54 788.26,957.43 678.02,958 716.02,958 750,958 930,965 960,965 990,965 30,966 817.65,980 848.07,990 678.02,992 716.02,992 750,992 788.26,992.43 930.93,995 960.93,995 990.93,995 1031.05,1006.81 1784.8,1006.81 1093.89,1007.93 817.65,1010 851.55,1024.41 931.8,1028.64 961.8,1028.64 990.93,1028.64 2135.35,1033.32 821.55,1041.25 715.51,1044.28 753.51,1044.28 787.49,1044.28 1134,1050.19 1309,1050.19 1699,1050.19 1962,1050.19 2004,1050.19 851.55,1054.07 30,1056.51 931.8,1058.64 961.8,1058.64 1004,1070.19 1044,1070.19 1084,1070.19 821.55,1071.25 851.55,1084.07 931.8,1088.64 961.8,1088.64 715.51,1094.28 753.51,1094.28 787.49,1094.28 821.55,1101.25 851.55,1114.07 931.8,1118.64 961.8,1118.64 1004,1120.19 1044,1120.19 1084,1120.19 821.55,1131.25 2135.35,1133.32 715.51,1144.28 753.51,1144.28 787.49,1144.28 851.55,1144.07 931.8,1148.64 961.8,1148.64 30,1156.51 1044,1160.19 2089,1160.19 821.55,1161.25 1004,1170.19 1729,1170.19 851.55,1174.07 931.8,1178.64 961.8,1178.64 821.55,1191.25 715.51,1194.28 753.51,1194.28 787.49,1194.28 851.55,1204.07 1044,1205.19 931.8,1208.64 961.8,1208.64 1199,1210.19 1934,1210.19 1449,1215.19 1829,1215.19 1004,1220.19 821.55,1221.25 2135.35,1233.32 851.55,1234.07 1274,1235 931.8,1238.64 961.8,1238.64 719.54,1244.28 753.51,1244.28 787.49,1244.28 1044,1245.19 821.55,1251.25 1809,1255.19 1859,1255.19 30,1256.51 851.55,1264.07 931.8,1268.64 961.8,1268.64 1004,1270.19 821.55,1281.25 352.58,1290.1 1044,1290.19 1934,1290.19 719.54,1294.28 753.51,1294.28 787.49,1294.28 851.55,1294.07 1199,1295.19 931.8,1298.64 961.8,1298.64 1764,1305.19 1809,1305.19 821.55,1311.25 1004,1320.19 352.58,1321.3 851.55,1324.07 931.8,1328.64 961.8,1328.64 1044,1330.19 1274,1330.19 2135.35,1333.32 1859,1335.19 821.55,1341.25 719.54,1344.28 753.51,1344.28 787.49,1344.28 851.55,1354.07 1719,1355.19 1764,1355.19 1809,1355.19 931.87,1358.64 961.9,1358.64 1004,1370.19 823.87,1371.25 1044,1375.19 1199,1375.19 1934,1375.19 855.32,1384.01 94.07,1386.62 133.44,1386.62 936.77,1388.24 968.47,1387.91 755.44,1394.28 789.42,1394.28 827.87,1400.98 1719,1405.19 1764,1405.19 1809,1405.19 862.13,1413.23 980.43,1413.23 1044,1415.19 1274,1415.19 954,1420.06 1859,1420.19 94.07,1422.05 133.44,1422.05 836.13,1429.82 999.84,1429.9 2135.35,1433.32 975.99,1439.01 1022.15,1438.7 875.15,1442.19 1047.15,1441.79 755.44,1444.28 800.44,1444.28 94.07,1457.49 133.44,1457.49 848.46,1457.17 1000.1,1456.86 1199,1460.19 1934,1460.19 1022.15,1465.62 892.15,1468.19 1047.15,1469.19 864.81,1485.45 809,1490.19 920,1497 1274,1500.19 1854,1505.19 2080.38,1505.19 895.46,1508.13 950.15,1518.19 844,1525.19 918.17,1527.73 976.04,1531 2135.35,1533.32 1004.99,1539.55 1199,1540.19 1934,1540.19 787.78,1541.14 1034.63,1544.18 948.68,1549.77 879,1560.19 976.04,1562.06 1004.9,1570.28 1034.63,1574.25 179.51,1585 2080.38,1590.52 1762.58,1598.92 1644,1600.19 834.78,1608.69 934.78,1608.69 1034.78,1608.69 61.85,1625 2135.35,1633.32 333.27,1653.12 773.67,1675.62 873.67,1675.62 973.67,1675.62 1073.67,1675.62 1564.96,1705.93 829.67,1719.62 929.67,1719.62 1029.67,1719.62 1754,1730.19 2135.35,1733.32 30,1756.51 1278,1765.19 1339,1765.19 1389,1765.19 61.85,1780 496.85,1815 596.85,1815 1278,1815.19 1339,1815.19 1389,1815.19 2135.35,1833.32 1829,1855.19 1278,1865.19 1339,1865.19 1389,1865.19 1389,1915.19 1001.15,1917.87 30,1956.51 1389,1965.19 436.94,1966.02 1389,2015.19 2135.35,2033.32 30,2056.51 1389,2065.19 882.12,2101.12 925.56,2101.12 968.99,2101.12 1389,2115.19 30,2156.51 1122.5,2207.02 900.32,2218.08 1121.98,2249.75 30,2256.51 900.32,2261.52 496.85,2267.03 557.85,2267.03 1121.98,2280.68 496.85,2310.46 557.85,2310.46 496.85,2353.89 557.85,2353.89 30,2356.51 862.13,2367.85 557.85,2397.33 862.13,2411.29 341.33,2422.12 390.42,2422.12 477.98,2442 2135.35,2443.8 30,2456.51 341.33,2459.59 390.42,2459.59 245.82,2496.39 341.33,2497.06 388.04,2509.15 388.04,2539.15 2135.35,2545.22 418.04,2552.03 517.61,2551.72 547.61,2551.72 577.61,2551.72 30,2556.51 640.81,2561.93 740.81,2561.93 840.81,2561.93 940.81,2561.93 1040.81,2561.93 1140.81,2561.93 1240.81,2561.93 1340.81,2561.93 1540.81,2561.93 388.04,2569.15 437.8,2574.9 517.61,2581.72 547.61,2581.72 577.61,2581.72 407.8,2592.03 245.82,2597.06 341.33,2597.06 1679.92,2598.96 437.8,2604.9 377.8,2609.15 517.61,2611.72 547.61,2611.72 577.61,2611.72 407.8,2622.03 2135.35,2633.32 437.8,2634.9 377.8,2639.15 517.61,2641.72 547.61,2641.72 577.61,2641.72 690.81,2641.93 790.81,2641.93 890.81,2641.93 990.81,2641.93 1090.81,2641.93 1190.81,2641.93 1290.81,2641.93 1390.81,2641.93 1490.81,2641.93 1590.81,2641.93 1753.92,2648.96 407.8,2652.03 30,2656.51 437.8,2664.9 377.8,2669.15 517.61,2671.72 547.61,2671.72 577.61,2671.72 407.8,2682.03 437.8,2694.9 341.33,2697.06 245.82,2697.72 377.8,2699.15 1679.92,2698.96 517.61,2701.72 547.61,2701.72 577.61,2701.72 407.8,2712.03 1470,2713 437.8,2724.9 640.81,2726.93 740.81,2726.93 840.81,2726.93 940.81,2726.93 1040.81,2726.93 1140.81,2726.93 1240.81,2726.93 1340.81,2726.93 1540.81,2726.93 377.8,2729.15 517.61,2731.72 547.61,2731.72 577.61,2731.72 2135.35,2733.32 407.8,2742.03 1594.92,2748.96 1753.92,2748.96 437.8,2754.9 1426.33,2754.55 30,2756.51 377.8,2759.15 517.61,2759.22 547.61,2759.22 577.61,2759.22 407.8,2772.03 437.8,2784.9 517.61,2786.72 547.61,2786.72 577.61,2786.72 377.8,2789.15 341.33,2797.06 245.82,2798.39 1679.92,2798.96 407.8,2802.03 1341.33,2804.55 1506.33,2804.55 517.61,2812.95 547.61,2812.95 577.61,2812.95 437.8,2814.9 377.8,2819.15 689,2822.93 789,2822.93 889,2822.93 989,2822.93 1089,2822.93 1189,2822.93 1289,2822.93 407.8,2832.03 2135.35,2833.32 518.54,2842.94 548.61,2842.93 578.68,2842.93 437.98,2844.9 378.07,2849.15 1594.92,2848.96 1753.92,2848.96 1426.33,2854.55 30,2856.51 408.64,2862.01 521.34,2872.8 551.59,2872.78 581.87,2872.76 439.58,2874.85 379.73,2879.11 411.06,2891.92 245.82,2899.06 342.65,2899.06 1679.92,2898.96 525.99,2902.44 556.54,2902.37 587.17,2902.29 442.83,2904.68 1341.33,2904.55 1506.33,2904.55 639,2907.93 739,2907.93 839,2907.93 939,2907.93 1039,2907.93 1139,2907.93 1239,2907.93 382.87,2908.94 415.03,2921.65 594.56,2931.36 532.47,2931.73 563.45,2931.57 1821.16,2931.53 2135.35,2933.32 447.73,2934.27 387.5,2938.58 1594.92,2948.96 1753.92,2948.96 420.56,2951.14 1426.33,2954.55 30,2956.51 572.27,2960.24 603.99,2959.84 540.76,2960.57 454.27,2963.55 393.59,2967.96 427.63,2980.29 582.98,2988.26 615.42,2987.58 550.83,2988.83 780.02,2991.1 880.02,2991.1 980.02,2991.1 462.41,2992.43 679.23,2991.54 341.33,2997.06 401.14,2996.99 1679.92,2998.96 1173,2999.93 1273,2999.93 244.49,3000.53 1341.33,3004.55 1506.33,3004.55 436.22,3009.04 628.79,3014.43 562.64,3016.4 595.52,3015.52 472.13,3020.81 410.13,3025.61 2135.35,3033.32 446.3,3037.29 644.04,3040.27 609.85,3041.88 576.14,3043.2 483.41,3048.61 1594.92,3048.96 1753.92,3048.96 420.54,3053.75 1426.33,3054.55 30,3056.51 457.85,3064.98 661.08,3064.96 625.88,3067.23 591.28,3069.1 735.51,3074.21 496.21,3075.74 830.02,3076.1 930.02,3076.1 1236.07,3076 432.33,3081.34 679.83,3088.38 396.61,3090 643.57,3091.46 470.84,3092.02 608,3094 341.33,3097.06 1679.92,3098.96 510.49,3102.12 446.26,3104.55 1341.33,3104.55 1506.33,3104.55 700.2,3110.4 662.82,3114.47 485.23,3118.35 626.23,3117.82 526.22,3127.67 722.08,3130.93 2135.35,3133.32 459.96,3134.58 683.56,3136.15 645.92,3140.46 500.97,3143.88 1594.92,3148.96 1753.92,3148.96 745.37,3149.85 543.32,3152.31 1426.33,3154.55 705.68,3156.41 30,3156.51 475.73,3160.1 666.97,3161.84 880.75,3164.49 769.94,3167.06 1082.68,3168.07 518.04,3168.56 729.11,3175.15 561.77,3175.97 1236.07,3176 689.31,3181.86 795.66,3182.49 492.75,3184.8 1000.18,3190.18 1165.18,3190.18 536.37,3192.31 753.72,3192.3 404.92,3193.96 822.42,3196.05 341.33,3197.06 581.5,3198.57 1679.92,3198.96 712.85,3200.45 1341.33,3204.55 1507.65,3206.55 779.42,3207.78 850.08,3207.68 1082.68,3208.07 510.98,3208.63 555.92,3215.06 878.49,3217.31 737.51,3217.54 602.45,3220.05 806.09,3221.53 1027,3223 907.51,3224.91 1145.18,3224.82 937,3230.42 530.38,3231.51 763.18,3233.07 833.61,3233.47 966.81,3233.82 996.78,3235.1 1908.09,3236.43 1951.4,3236.43 1994.7,3236.43 576.64,3236.75 624.55,3240.33 1047.09,3243.13 1082.68,3243.13 489.92,3243.96 861.86,3243.56 789.76,3246.97 1594.92,3248.96 1225.57,3250.57 890.71,3251.76 550.89,3253.41 341.33,3255 1126.63,3255 1426.33,3254.55 30,3256.51 598.47,3257.33 920.05,3258.03 647.74,3259.36 817.16,3259.19 949.74,3262.33 1026.73,3262.33 979.65,3264.66 1730.81,3265.76 845.27,3269.68 1190.93,3270.57 1002.51,3272.91 572.46,3274.25 621.35,3276.74 671.95,3277.08 873.97,3278.41 263.62,3280 1908.09,3279.74 1951.4,3279.74 1994.7,3279.74 903.16,3285.33 1159,3287 932.72,3290.43 697.11,3293.43 404.92,3293.96 595.05,3293.99 962.55,3293.67 645.21,3294.92 992.52,3295.06 1679.92,3298.96 341.33,3305 1341.33,3304.55 1506.33,3304.55 723.12,3308.36 669.99,3311.83 618.59,3312.59 571,3321.84 749.93,3321.84 1908.09,3323.04 1951.4,3323.04 1994.7,3323.04 695.63,3327.41 643.03,3329.98 1172,3331 1207.68,3333.07 1247.68,3333.07 777.44,3333.8 722.04,3341.63 489.92,3343.96 805.57,3344.23 668.31,3346.14 1594.92,3348.96 1730.81,3348.96 834.23,3353.09 749.17,3354.44 341.33,3355 1426.33,3354.55 30,3356.51 863.34,3360.34 694.36,3361.02 776.93,3365.81 892.81,3365.98 922.54,3369.97 952.45,3372.32 982.44,3373.01 721.12,3374.58 805.25,3375.72 1160.28,3378 834.05,3384.12 748.52,3386.8 863.25,3391 992.68,3393.01 404.92,3393.96 569.92,3393.96 892.77,3396.34 1190.93,3395.57 1020,3397 776.5,3397.63 1679.92,3398.96 922.53,3400.13 952.45,3402.35 1341.33,3404.55 1506.33,3404.55 804.98,3407.06 1126.63,3411 833.89,3415.05 1225.57,3415.57 863.17,3421.6 992.68,3423.01 1022.68,3423.01 1052.68,3423.01 1082.68,3423.01 892.74,3426.68 922.52,3430.28 952.45,3432.39 2135.35,3433.32 1145.18,3441.32 489.92,3443.96 1594.92,3448.96 1730.81,3448.96 1256.21,3453.92 1426.33,3454.55 30,3456.51 1082.68,3458.07 628,3463.96 728,3463.96 828,3463.96 928,3463.96 1028,3463.96 1000.18,3475.96 1165.18,3475.96 404.92,3493.96 569.92,3493.96 1082.68,3498.07 1679.92,3498.96 1341.33,3504.55 1506.33,3504.55 2135.35,3533.32 489.92,3543.96 678,3543.96 778,3543.96 878,3543.96 978,3543.96 1594.92,3548.96 1730.81,3548.96 1256.21,3553.92 1426.33,3554.55 30,3556.51 404.92,3593.96 569.92,3593.96 1679.92,3598.96 628,3601 728,3601 828,3601 928,3601 1028,3601 1341.33,3604.55 1506.33,3604.55 2135.35,3633.32 1730.81,3648.96 1594.92,3656 30,3656.51 1479.04,3659.09 1253,3660 1365.23,3659.54 1167,3666 678,3681 778,3681 878,3681 978,3681 440.81,3691.93 540.81,3691.93 2135.35,3733.32 430.81,3746.93 530.81,3746.93 630.81,3746.93 730.81,3746.93 830.81,3746.93 930.81,3746.93 1030.81,3746.93 1130.81,3746.93 1230.81,3746.93 1330.81,3746.93 1430.81,3746.93 1530.81,3746.93 1630.81,3746.93 1730.81,3746.93 30,3756.51 406.85,3825 480.81,3826.93 580.81,3826.93 680.81,3826.93 780.81,3826.93 880.81,3826.93 980.81,3826.93 1080.81,3826.93 1180.81,3826.93 1280.81,3826.93 1380.81,3826.93 1480.81,3826.93 1580.81,3826.93 1680.81,3826.93 2135.35,3833.32 30,3856.51 1139,3874.99 430.81,3890.93 530.81,3911.93 630.81,3911.93 730.81,3911.93 830.81,3911.93 930.81,3911.93 1030.81,3911.93 1330.81,3911.93 1430.81,3911.93 1530.81,3911.93 1630.81,3911.93 1730.81,3911.93 2135.35,3933.32 30,3956.51 2135.35,4033.32 30,4056.51 2135.35,4133.32 30,4156.51 95.81,4331.8 195.81,4331.93 295.81,4331.93 395.81,4331.93 495.81,4331.93 595.81,4331.93 695.81,4331.93 795.81,4331.93 1295.81,4331.93 1395.81,4331.93 1495.81,4331.93 1595.81,4331.93 1695.81,4331.93 1795.81,4331.93 1895.81,4331.93 1995.81,4331.93
  other v2: 2135.35,2125.57 2135.35,2229.71 2135.35,2349.78
  other v3: 297.64,1873.42 593.91,2086.2 560,2087.22 526.94,2088.27
GPS_ANT: A6.11 A7.S | length 2436.5
  Top Layer w31.5: 477.98,2820.97 cw(c990.08,2820.97) 990.08,3333.07 ; 477.98,2820.97 cw(c990.08,2820.97) 990.08,3333.07 ; 477.98,2820.97 A6.11@477.98,2499.74 477.98,2820.97 ; 990.08,3333.07 A7.S@1082.68,3333.07 990.08,3333.07
GPS_EN: A4.23 R34.1 | length 2237.2
  Top Layer w6: R34.1@899.24,1768.59 899.24,1753.78 910.6,1742.41 v2(1175.5,1742.41) ; A4.23@2038.74,1203.52 A4.23@2038.74,1203.52 v2(2102.43,1203.47)
  Bottom Layer w6: v2(1175.5,1742.41) 1222.34,1695.58 1222.34,1025.24 1325.45,922.12 1877.77,922.12 1914.72,959.07 1914.72,1132.77 1985.42,1203.47 v2(2102.43,1203.47)
GPS_I2C_SCL: A4.27 R20.2 U6.5 | length 1912.6
  Top Layer w6: R20.2@1268.54,2448.04 R20.2@1268.81,2447.76 ; U6.5@1310.44,2447.76 1310.72,2447.49 1341.29,2447.49 1360.25,2466.44 1360.25,2508.03 1370.65,2518.43 1570.02,2518.43 1641.1,2447.35 1641.1,2412.2 1678.65,2374.65 v2(1896.45,2374.65) ; A4.27@2038.74,1376.75 2041.49,1379.52 v1(2089.38,1379.52)
  Top Layer w8: R20.2@1268.81,2447.76 U6.5@1310.44,2447.76
  Bottom Layer w6: v2(1896.45,2374.65) 1896.45,2197.18 2005.65,2087.98 2005.65,1422.81 2048.94,1379.52 v1(2089.38,1379.52)
GPS_I2C_SDA: A4.26 R19.2 U6.4 | length 1568
  Top Layer w6: A4.26@2038.74,1333.44 2038.85,1333.32 v1(2089.38,1333.32)
  Top Layer w8: U6.4@1546.95,2447.48 R19.2@1591.88,2447.48 ; R19.2@1591.89,2447.47 1612.63,2447.47 1626.73,2433.36 1626.73,2405.84 1686.42,2346.15 v2(1859,2346.15)
  Bottom Layer w6: v2(1859,2346.15) 1859,2210.47 1988.94,2080.52 1988.94,1367.31 2022.93,1333.32 v1(2089.38,1333.32)
GPS_SCL: A6.19 R21.2 U6.8 | length 787.1
  Top Layer w6: A6.19@769.32,2027.29 769.32,2092.09 843.18,2165.94 v3(1152.17,2165.94) ; R21.2@1268.54,2360.61 R21.2@1269.01,2360.13
  Top Layer w8: v3(1152.17,2229.16) 1185.06,2229.16 1268.54,2312.64 R21.2@1268.54,2360.61 ; R21.2@1269.01,2360.13 1277.82,2360.13 1288.4,2370.71 U6.8@1310.72,2370.71
  Bottom Layer w6: v3(1152.17,2165.94) v3(1152.17,2229.16)
GPS_SDA: A6.18 R30.2 U6.1 | length 1099.2
  Top Layer w6: A6.18@726.01,2027.29 726.01,2086.67 827.29,2187.94 1176.07,2187.94 1260.82,2272.69 1260.82,2272.91 1309.91,2322 1350.28,2322 1383.26,2289.02 1471.66,2289.02 1490.81,2308.16 1490.81,2355.55 1505.97,2370.71 1546.94,2370.71 1547.02,2370.8 1592.87,2370.8 R30.2@1592.95,2370.88
GPS_TX: A6.20 U5.2 | length 713.9
  Top Layer w6: A6.20@812.63,2027.29 812.63,2084.98 872.87,2145.23 1274.1,2145.23 1372.92,2244.04 U5.2@1402.94,2244.04
I2C_SCL: IC9.2 IC13.1 R28.1 U3.11 | length 3634.1
  Top Layer w6: v1(62.85,1316) 81.85,1335 121.85,1335 159,1372.15 159,1517.15 171.71,1529.87 ; 171.91,1529.67 184.24,1542 v1(246.85,1542) ; v2(639.03,1865.2) 676.85,1903.01 676.85,2115.31 959.57,2398.03 v1(1000.93,2398.03)
  Top Layer w8: v1(1822.35,3340.5) 1833.9,3328.95 IC9.2@1852.97,3328.95